# Altium PCB VA_HUB_PCB.PcbDoc (part 11 of 12)
Units mil, origin at the board's own origin, x right, y up, seen from the top; angles counter-clockwise.
Board outline 4408 x 3619 mil, 8 copper layers (Top Layer, Routing 1, Routing 2, Power Plane, GND Plane, Routing 3, Routing 4, Bottom Layer), stack 85.156 mil thick; 569 components, 440 nets, 2911 pads, 1518 vias.
Unrouted connection lines stored in the file: 46.
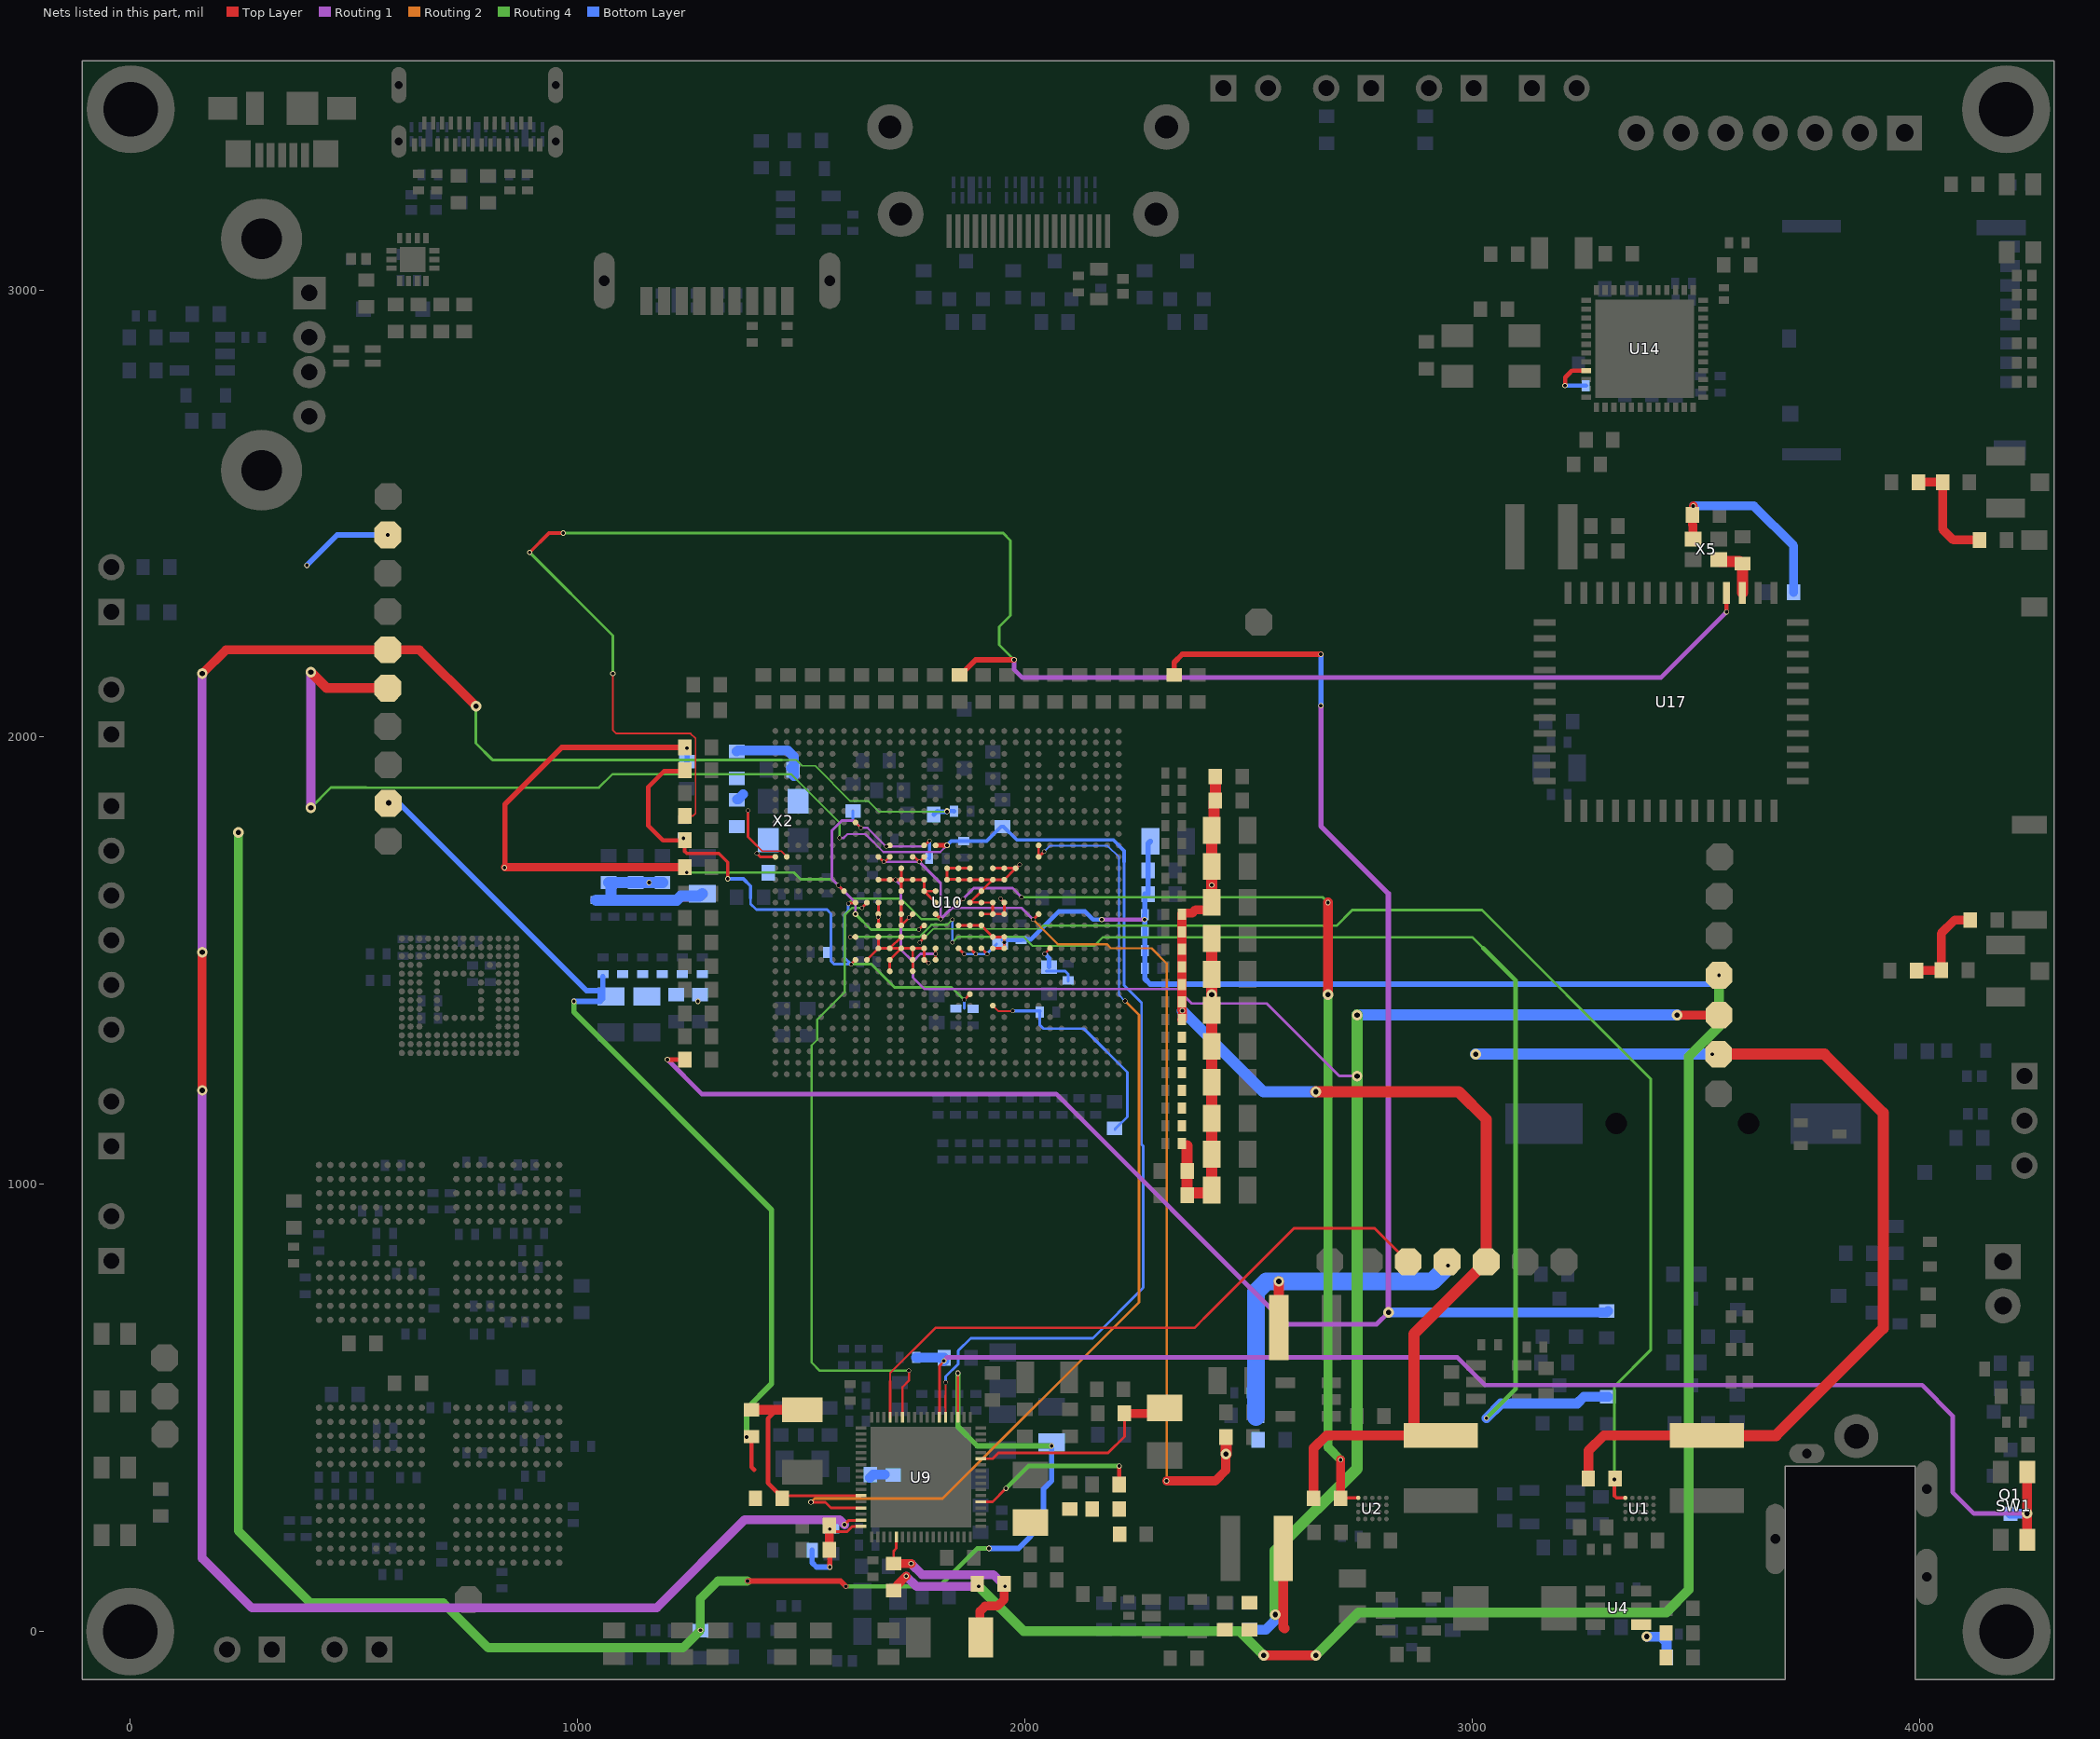
[diagram p14: the nets of this part, all layers, seen from the top]

## Via types
v1: diameter 9.84, hole 7.87, Top Layer to Bottom Layer, 821 vias
v2: diameter 11.81, hole 7.87, Top Layer to Bottom Layer, 575 vias
v3: diameter 23.62, hole 11.81, Top Layer to Bottom Layer, 122 vias

## Nets (pads, with @x,y where several pads share a name; then routed paths per layer and width w, separated by ;. In a path a pad name is that pad's centre, name@x,y a point inside that pad or via, vN(x,y) a via of type N, cw(c..) or ccw(c..) an arc to the next point about the centre after c; other vN are vias at no path point) (continued)
VCC_SDIO: U9.12 U10.T23 | length 1428.1
  Top Layer w5: U9.12@1726.53,479.05 1726.53,546.53 1741,561 1741,583 v1(1740.65,583.35)
  Top Layer w6: v1(1636,1618) 1636,1618.43 1647.05,1629.48 U10.T23@1647.05,1629.92
  Routing 4 w5: v1(1636,1618) 1613.57,1618 1597,1601.43 1597,1429.5 1535.82,1368.32 1535.82,1323 1523.5,1310.68 1523.5,601.5 1542,583 1740.29,583 v1(1740.65,583.35)
VCC_VDC: R28.2 R29.2 | length 36.2
  Bottom Layer w22: R29.2@1653.74,343.82 1661.24,351.32 1686.82,351.32
VCCA0V9_HDMI: C142.1 C143.1 P8.1 U9.5 U10.AA16 U10.AA17 | length 4137.8
  Top Layer w5: U9.5@1822.99,479.05 1822.99,500.24 1822.2,501.03 1822.2,527.5 1822.99,528.29 v1(1823,557)
  Top Layer w10: U10.AA17@1800.59,1757.87 U10.AA16@1826.18,1757.87
  Top Layer w22: v3(403.81,2145) 439.39,2109.42 P8.1@575.82,2109.42
  Routing 1 w5: v1(1586,1774.58) 1595.01,1774.58 1603.52,1783.09 1643.91,1783.09 1683.94,1743.06 1811.06,1743.06 v1(1826,1758)
  Routing 1 w20: v3(403.81,1842) v3(403.81,2145)
  Routing 4 w5: 528,1887 1048,1887 1078,1917 1477.68,1917 1586,1808.68 v1(1586,1774.58)
  Routing 4 w6: v3(403.81,1842) 448.81,1887 528,1887
  Bottom Layer w6: v1(1823,557) 1823,570 1851,598 1851,628 1879,656 2152,656 2264.92,768.92 2264.92,1085.5 2261.17,1089.25 2261.17,1405.83 2222,1445 2222,1721
  Bottom Layer w8: v1(1826,1758) 1835.32,1767.32 1914.82,1767.32 1947.32,1799.82 1952.32,1799.82 1982.14,1770 2197.91,1770 2222,1745.91 2222,1721
VCCA1V8_CODEC: U9.31 U10.AA8 U10.Y8 | length 2275.9
  Top Layer w6: v2(1522,289.17) 1554.1,289.17 1566.98,276.29 U9.31@1634.01,276.29 ; U10.Y8@2030.91,1732.09 U10.Y8@2030.91,1732.28 U10.AA8@2030.91,1757.87 ; U10.Y8@2031.1,1732.09 v1(2043.19,1744.18)
  Routing 2 w6: v2(1522,289.17) 1522.59,289.17 1530.42,297 1816.15,297 2255.27,736.12 2255.27,1378.73 v1(2224,1410)
  Bottom Layer w4: v1(2043.19,1744.18) 2056,1757 2185.32,1757 2211,1731.32 2211,1423 v1(2224,1410)
VCCA1V8_HDMI: C144.1 C145.1 P9.1 U9.33 U10.AD16 | length 5520.3
  Top Layer w6: v2(1597,239) 1606.73,248.73 U9.33@1634.01,248.73
  Top Layer w20: v3(161,1210.19) v3(161,1519) ; v3(161,2142) 214.02,2195.02 P9.1@575.82,2195.02 646.98,2195.02 v3@772.31,2069.69
  Routing 1 w20: v3(161,1210.19) 161,164 272,53 1177,53 1374,250 1586,250 v2(1597,239) ; v3@161,1519.98 v3(161,2142)
  Routing 4 w4: 1456.82,1949.09 1488.99,1949.09 1502.39,1935.69 1531.31,1935.69 1610,1857 1650.28,1857 1673.78,1833.5 1825.59,1833.5 v1(1826.18,1832.9)
  Routing 4 w6: v3(773,2069) 773,1986 809.91,1949.09 1456.82,1949.09
  Bottom Layer w10: C144.1@1796.82,1826.82 1804.64,1834.64 1806.38,1832.9 v1(1826.18,1832.9) ; v1@1826.18,1834.64 1841,1834.64 C145.1@1841.82,1833.82
VCCA3V0_CODEC: P6.1 U9.14 | length 1422.3
  Top Layer w5: 1698.97,559.82 1698.97,577.97 1800,679 2379,679 2400,700
  Top Layer w6: U9.14@1698.97,479.05 1698.97,559.82 ; 2400,700 2602,902 2781.84,902 P6.1@2857.02,826.82
VCCA_0V9: C5.1 C6.1 C9.1 C130.1 C147.1 C154.1 C248.1 L5.1 P5.1 R17.2 R73.1 SB19.2 U10.H14 U10.L24 U10.R8 U10.R17 U10.T24 U10.Y18 U10.Y19 U10.Y21 U10.Y22 | length 4731.3
  Top Layer w6: v1(1605.55,1627.55) 1606.59,1627.55 1607.62,1628.58 1620.12,1628.58 U10.T24@1621.46,1629.92 ; v1@1611.75,1492.25 U10.L24@1621.46,1501.96 ; U10.Y22@1672.64,1732.28 1673.18,1732.28 1684.46,1721 v1(1685,1721) 1685.74,1721.74 1687.69,1721.74 U10.Y21@1698.23,1732.28 ; U10.Y19@1749.41,1732.28 1750.75,1730.94 1754.06,1730.94 v1(1764,1721) 1764,1721.14 1772.79,1729.93 1772.79,1730.85 1772.34,1731.3 U10.Y18@1774.17,1731.3 ; U10.R17@1800.59,1604.33 v1@1811.96,1593 ; v1(1864.45,1412.4) 1864.51,1412.4 U10.H14@1877.37,1425.19 U10.H14@1877.37,1425.19 ; v1@2018.58,1592 U10.R8@2030.91,1604.33
  Top Layer w8: R73.1@1239.82,1769.82 1239.82,1744.51 1244.51,1739.82 1316.18,1739.82 1336,1720 v2(1336,1683)
  Top Layer w10: v2(1236.82,1773.59) R73.1@1237.69,1774.46 ; SB19.2@1239.82,1923.82 1193.82,1923.82 1158,1888 1158,1802 1191,1769 1229.82,1769 1236.48,1775.66 1241,1771.14 R73.1@1241,1766.14
  Top Layer w20: v2(2317,337) 2425.82,337 2449.13,360.31 2449.13,396.13 v3(2449.82,396.82)
  Top Layer w22: L5.1@2567.77,683.82 2567.88,683.94 2567.88,782.88 v3(2568,783)
  Top Layer w25: v3(2449.82,396.82) R17.2@2449.82,434.82
  Routing 1 w6: v1(1685,1721) v1(1764,1721) 1812,1673 v1(1812,1593) 1837,1618 1992.5,1618 v1(2018.58,1591.92)
  Routing 4 w5: v1(1605.55,1627.55) 1616.5,1638.5 1723.5,1638.5 1769,1593 v1(1812,1593)
  Routing 4 w6: v1(1612,1492) 1657,1492 1709,1440 1836.84,1440 v1(1864.45,1412.4)
  Routing 2 w5: v1(2018.58,1591.92) 2073.5,1537 2183.13,1537 2192.3,1527.83 2283.17,1527.83 2317,1494 v2(2317,337)
  Bottom Layer w6: 1387,1640 1387,1627 1400,1614 1558,1614 1567,1605 1567,1499 1574,1492 v1(1612,1492) 1597,1507 1597,1603 1605.55,1611.55 v1(1605.55,1627.55) ; 1864.45,1393.2 v1(1864.45,1412.4)
  Bottom Layer w8: v2(1336,1683) 1371,1683 1387,1667 1387,1640
  Bottom Layer w40: C5.1@2516.82,479.82 2516.82,759.57 2540.25,783 2911,783 v2(2946,818)
VCCA_1V8: C62.1 C152.1 P11.1 R21.2 R58.2 R66.2 R74.1 SB20.2 U9.3 U10.AA18 U10.AA21 U10.AC24 U10.P18 U10.R24 U10.U25 | length 6636.1
  Top Layer w5: U10.AC24@1621.46,1809.05 U10.AC24@1621.46,1809.05 v1(1633.18,1797.19) v1(1633.18,1797.19) ; v1(1690.43,1755.49) 1691.35,1756.41 1696.77,1756.41 U10.AA21@1698.23,1757.87
  Top Layer w6: v1(1583.07,1668.3) U10.U25@1595.87,1655.51 ; v1(1763.1,1569.67) 1768.67,1575.24 1769.62,1575.24 1773.11,1578.74 U10.P18@1775,1578.74 ; U10.AA18@1775,1757.87 1776.87,1757.87 v1(1787,1768) ; v2(1850.42,577.45) 1850.48,577.39 1850.48,479.11 U9.3@1850.55,479.05
  Top Layer w12: v2@838.02,1709.02 838.02,1850.02 965,1977 1237.64,1977 1239.82,1974.82 1240.19,1975.19 v2(1245,1975.19) ; v1(1380,113) 1588,113 v1(1600,101)
  Top Layer w18: v2@838.02,1709.02 R74.1@1239.82,1709.02
  Routing 1 w5: v1(1633.18,1797.19) 1633.38,1797 1648.11,1797 1689.62,1755.49 v1(1690.43,1755.49) 1690.49,1755.42 1774.42,1755.42 v1(1787,1768)
  Routing 1 w6: v1(1621.33,1604.33) 1621.33,1630.05 1569,1682.38 1569,1791 1591,1813 1617.52,1813 1633.18,1797.33 v1(1633.18,1797.19)
  Routing 4 w6: v2(1244,1697) 1484,1697 1499,1682 1569.38,1682 v1(1583.07,1668.3) ; v1(1621.33,1604.33) 1655.98,1569.67 v1(1763.1,1569.67)
  Routing 4 w10: v1(1600,101) 1809,101 1893.65,185.65 1919.65,185.65 v2(1920,186)
  Routing 4 w12: v2@1850.55,577.45 1850.55,458.45 1894.08,414.92 v2(2059.82,414.92)
  Routing 4 w20: v3(242.19,1787) 242.19,224.81 403,64 700,64 800,-36 1236,-36 v2(1274.82,2.82) 1274.82,73.82 1314,113 v1(1380,113)
  Bottom Layer w6: R58.2@1616,1835 1616,1814.52 1633.18,1797.33 v1(1633.18,1797.19)
  Bottom Layer w8: C152.1@1786.32,1728.82 1787,1729.5 v1(1787,1768)
  Bottom Layer w12: v2(395,2384) 462.82,2451.82 v2(575.82,2451.82) ; R66.2@1244.82,1944.82 1245,1945 v2(1245,1975.19) ; v2(1920,186) 1986,186 2041.87,241.87 2041.87,318.87 2059.82,336.82 v2(2059.82,414.92)
  other v2: 837,1708
VDC_RK8: C59.1 C61.2 D7.2 R47.2 U9.34 | length 236.6
  Top Layer w6: v2(1564,229) 1570,223 1602,223 1613.95,234.95 U9.34@1634.01,234.95
  Top Layer w12: R47.2@1563.82,182.82 1564,182.64 1564,177.76 v2(1564,144)
  Top Layer w20: C59.1@1562.82,223 1562.82,183.82 R47.2@1563.82,182.82 ; C59.1@1562.82,236.82 1564,235.64 v2(1564,229)
  Bottom Layer w12: D7.2@1524.62,181.82 1524.62,153.95 1534.56,144 v2(1564,144)
VDD_CENTER: C73.1 C74.1 C76.1 C78.1 C79.1 C80.1 C81.1 C83.1 C85.1 P17.1 R30.1 SB1.1 U10.M11 U10.M12 U10.M13 U10.M14 U10.M15 U10.N11 U10.N12 U10.P13 U10.P14 U10.P15 | length 5582.6
  Top Layer w6: U10.M15@1851.77,1527.55 v1(1864.57,1514.76) ; U10.P15@1851.77,1578.74 U10.P14@1877.37,1578.74 U10.P13@1902.96,1578.74 1915.75,1565.94 1927.84,1553.85 1927.84,1553.14 U10.N12@1928.55,1553.14 U10.N11@1954.14,1553.14 1954.07,1553.08 v1(1954,1541) v1(1954,1541) 1954.07,1540.93 1954.07,1527.62 U10.M11@1954.14,1527.55 U10.M12@1928.55,1527.55 ; U10.M14@1877.37,1527.55 v1(1890.16,1514.76) ; U10.M13@1902.96,1527.55 v1(1915.75,1514.76)
  Top Layer w20: R30.1@1706.87,91.83 1709.37,91.83 1714.37,96.83 1714.37,103.37 v2(1734.84,123.84)
  Top Layer w22: v3(2534,-53) v3(2650.81,-53)
  Routing 1 w10: v2@2172.49,1592 v2(2268,1592)
  Routing 1 w20: v2(1734.84,123.84) 1757.68,101 v2(1897,101)
  Routing 4 w22: v2(1897,101) 1997.18,0.82 2480.18,0.82 v3@2531,-50 ; v3(2650.81,-53) 2746.81,43 3434,43 3484.56,93.56 3484.56,1285.56 3551.73,1352.73 v2@3551.73,1467
  Bottom Layer w6: v1(1864.57,1514.76) 1889,1514.76 v1@1890.16,1515.92 ; v1(1890.16,1514.76) 1914.76,1514.76 C73.1@1937,1537
  Bottom Layer w10: C73.1@1951.32,1546.32 C78.1@1991.82,1546.32 1993.01,1547.51 2013.34,1547.51 2075.83,1610 2135,1610 2153,1592 v2(2172,1592)
  Bottom Layer w12: C81.1@2268,1594 2268,1602.5 C81.1@2268.32,1602.82 C76.1@2268.32,1648.82 ; C81.1@2268.32,1594 C83.1@2268.32,1562.82 C79.1@2268.32,1522.82 C80.1@2268.32,1482.82 2268.32,1459.68 2280.36,1447.64 3532.36,1447.64 v2@3551.73,1467 ; C76.1@2275.82,1648.82 C85.1@2275.82,1701.82 2275.82,1761.82 C74.1@2280.82,1766.82
  other v2: 3551.82,1467.09
VDD_CPU_B: C97.1 C99.1 C101.1 C103.1 C105.1 C107.1 C109.1 C111.1 C112.1 C113.1 C114.1 C115.1 C116.1 C117.1 C119.1 C121.1 C123.1 L1.1 P2.1 R10.2 U10.K19 U10.K21 U10.L18 U10.L19 U10.L21 U10.L23 U10.M18 U10.M19 U10.M20 U10.M21 U10.M22 U10.N20 U10.N22 | length 3350.8
  Top Layer w6: U10.L23@1647.05,1501.96 U10.M22@1672.64,1527.55 ; U10.N22@1672.64,1553.14 U10.M22@1672.64,1527.55 ; U10.K21@1698.23,1476.37 U10.L21@1698.23,1501.96 U10.M20@1723.82,1527.55 ; U10.N20@1723.82,1553.14 U10.M21@1698.23,1527.55 ; U10.K19@1748.93,1476.37 U10.K19@1749.41,1476.37 ; U10.K19@1749,1477 1749.41,1477.41 U10.L19@1749.41,1501.96 U10.M19@1749.41,1527.55 ; v1(1784.84,1494.76) 1783.8,1494.76 1776.6,1501.96 U10.L18@1775,1501.96 U10.M18@1775,1527.55 U10.M19@1749.41,1527.55 ; U10.M22@1672.64,1527.55 U10.M21@1698.23,1527.55 ; U10.M21@1698.23,1527.55 U10.M20@1723.82,1527.55 ; U10.M20@1723.82,1527.55 U10.M19@1749.41,1527.55
  Top Layer w22: R10.2@3259.82,341.82 3259.82,403.82 3294.49,438.49 L1.1@3524.82,438.49
  Top Layer w25: C97.1@2362.82,975.82 C97.1@2362.82,978.32 ; 2362.82,1086.32 C115.1@2362.82,1029.82 C97.1@2362.82,978.32 ; C103.1@2417.82,1469.46 C119.1@2417.82,1549.9 ; v3@2418,1423.45 2418,1389.2 C101.1@2417.82,1389.02 C99.1@2417.82,1308.58 C116.1@2417.82,1228.14 C117.1@2417.82,1147.7 C123.1@2417.82,1067.26 C121.1@2417.82,986.82 2411.82,980.82 2365.32,980.82 C97.1@2362.82,978.32 ; v3(2418,1424.14) C103.1@2418,1469.28 ; L1.1@3524.82,438.49 3679.49,438.49 3919,678 3919,1159.64 3787.73,1290.91 P2.1@3550.82,1290.91
  Bottom Layer w25: v3@3008,1290.91 v2(3536.82,1290.91)
  other v3: 3008,1291
VDD_CPU_B_FB: R10.1 U1.A4 U10.N18 | length 2832.3
  Top Layer w6: v1(1765.01,1540.58) 1765.01,1541.62 1775,1551.61 U10.N18@1775,1553.14 ; v2(3317.82,339.82) R10.1@3319.82,341.82
  Top Layer w8: v2(3317.82,339.82) 3317.82,303.82 3322.82,298.82 U1.A4@3342.58,298.82
  Routing 4 w4: v1(1765.01,1540.58) 1795.51,1571.08 2034.08,1571.08 2037.54,1574.54
  Routing 4 w5: 2037.54,1574.54 2041,1578 2697,1578 2714.5,1595.5
  Routing 4 w6: 2714.5,1595.5 2732,1613 3022,1613 3399,1236 3399,629 3317.82,547.82 v2(3317.82,339.82)
VDD_CPU_L: C63.1 C64.1 C65.1 C66.1 C67.1 C68.1 C69.1 C70.1 C71.1 C72.1 P18.1 R31.1 SB2.1 U10.P20 U10.P22 U10.R19 U10.R20 U10.R22 U10.T20 U10.T22 | length 2184.2
  Top Layer w6: U10.P22@1672.64,1578.74 v1(1672.64,1597) U10.R22@1672.64,1604.33 U10.T22@1672.64,1629.92 ; U10.T20@1723.82,1629.92 U10.R20@1723.82,1604.33 U10.P20@1723.82,1578.74 1723.89,1578.74 v1@1741,1595.85 ; v1@1741.04,1596 U10.R19@1749.37,1604.33
  Top Layer w10: v2(1378.09,435) SB2.1@1388.87,435 ; SB2.1@1388.87,435.83 1388.87,367.78 1394.82,361.82
  Routing 4 w6: v1(1672.64,1597) v1@1672.93,1596.71 ; v1@1740.71,1596.71 v1(1741,1596.42)
  Routing 4 w12: v2(992.05,1409) 992.05,1384.95 1434,943 1434,554 1378.09,498.09 v2(1378.09,435)
  Bottom Layer w12: v3(577.81,1852.82) 578.21,1852.43 600.57,1852.43 1020.03,1432.97 1050.82,1432.97 C66.1@1050.82,1419 ; v2(992.05,1409) 1050.82,1409 1056.82,1415 C70.1@1056.82,1464.32
  other v2: 1269,1409
VDD_DDR0_CLK: C259.1 R45.2 U10.M7 | length 118.6
  Top Layer w5: v1@2045.05,1515.76 U10.M7@2056.5,1527.21
  Bottom Layer w5: R45.2@2054,1486 R45.2@2054.89,1486.89
  Bottom Layer w6: R45.2@2048.11,1476.37 2090.63,1476.37 2097,1470 C259.1@2097,1453.5
  Bottom Layer w10: v1(2045.05,1515.41) 2054,1506.46 R45.2@2054,1486
VDD_DDR1_CLK: C141.1 R49.2 U10.G12 | length 518.7
  Top Layer w4: U10.G12@1928.55,1398.6 1929.55,1398.6 1941.33,1386.82 1972.07,1386.82 v1(1972.82,1387.58)
  Bottom Layer w6: C141.1@2033.5,1385 2033.5,1356.5 2042,1348 2132,1348 2229.17,1250.83 2229.17,1150.67 2201.82,1123.32 R49.2@2201.82,1121.89
  Bottom Layer w8: v1(1972.82,1387.58) 2032.74,1387.58 C141.1@2033.5,1386.82
VDD_GPU: C92.1 C93.1 C94.1 C95.1 C96.1 C98.1 C100.1 C102.1 C104.1 C106.1 C108.1 C110.1 L2.1 P3.1 R11.2 U10.R11 U10.R12 U10.R13 U10.T11 U10.T12 U10.T13 U10.T14 U10.U13 U10.V11 U10.V12 U10.V13 U10.V14 U10.V15 U10.V16 U10.W10 U10.W11 U10.W12 U10.W14 U10.W15 U10.W16 | length 3045.5
  Top Layer w5: U10.T14@1877.37,1629.92 1877.74,1630.29 1902.58,1630.29 U10.T13@1902.96,1629.92 U10.T12@1928.55,1629.92
  Top Layer w6: U10.T14@1877.37,1629.92 U10.U13@1902.96,1655.51 U10.U13@1902.96,1655.51 1915.75,1668.37 1915.82,1668.37 U10.V12@1928.55,1681.1 ; U10.W14@1877.37,1706.69 U10.W15@1851.77,1706.69 1851.62,1706.84 1839.16,1706.84 1839,1707 1838.84,1706.84 1826.34,1706.84 U10.W16@1826.18,1706.69 1826.18,1682.74 1827.01,1681.92 1850.95,1681.92 U10.V15@1851.77,1681.1 U10.V14@1877.37,1681.1 U10.V13@1902.96,1681.1 U10.V12@1928.55,1681.1 ; U10.R13@1902.96,1604.33 U10.R12@1928.55,1604.33 ; U10.T12@1928.55,1629.73 U10.R12@1928.55,1604.33 ; U10.W12@1928.55,1706.69 U10.W10@1979.73,1706.69 ; v1(1946,1639) 1946,1638.53 1954.14,1630.39 U10.T11@1954.14,1629.92 ; U10.T11@1954.14,1631.86 U10.R11@1954.14,1604.33 U10.R12@1928.55,1604.33 ; U10.W10@1979.73,1708.17 U10.W10@1979.73,1706.69 ; U10.W10@1980.2,1706.69 v1@1988.34,1714.83 ; U10.V12@1928.55,1681.1 U10.V11@1954.14,1681.1 U10.W10@1979.73,1706.69
  Top Layer w20: C102.1@2351.32,1368.32 2352.32,1369.32 2352.32,1380.05 2352.41,1380.13 v2(2352.41,1388.3) ; v2@2351.32,1388.3 C98.1@2351.32,1446.95 C96.1@2351.32,1486.26 C108.1@2351.32,1525.82 2351.32,1605.24 2352.32,1606.24 2374.24,1606.24 2381.87,1613.87 2407.82,1613.87 2417.82,1623.87 C95.1@2417.82,1630.34
  Top Layer w22: R11.2@2645.82,297.82 2645.82,409.82 2674.49,438.49 L2.1@2865,438.49
  Top Layer w25: C95.1@2417.82,1630.34 v2(2417.82,1669.09) C94.1@2417.82,1710.78 C93.1@2417.82,1791.22 2423.32,1796.72 2423.32,1855.32 C110.1@2425.82,1857.82 C92.1@2425.82,1911.82 ; v3(2650.72,1207) 2970,1207 3031.42,1145.58 P3.1@3031.42,826.82 ; L2.1@2865,438.49 2870,443.49 2870,665.4 P3.1@3030.52,825.92
  Bottom Layer w25: v2(2352.41,1388.3) 2352.41,1387.66 2533.06,1207 v3(2650.72,1207)
  other v1: 1988.81,1714.83
VDD_GPU_FB: R11.1 U2.A4 U10.T15 | length 2236.9
  Top Layer w6: U10.T15@1851.77,1629.92 1852.88,1629.92 1860.96,1638 v1(1862,1638)
  Top Layer w8: R11.1@2706.82,298.82 U2.A4@2745.58,298.82
  Top Layer w12: R11.1@2705.82,297.82 R11.1@2706.82,298.82
  Top Layer w20: R11.1@2705.82,297.82 2705.82,383.82 v2(2706,384)
  Top Layer w22: v3(2678,1424.14) v2(2678,1630)
  Routing 1 w6: v1(1862,1638) 1886,1662 1972.92,1662 1992.94,1641.98 v1(1992.94,1641.9)
  Routing 4 w6: v1(1992.94,1641.9) 2666.08,1641.92 v2(2678,1630)
  Routing 4 w20: v3(2678,1424.14) 2678,412 v2(2706,384)
VDD_LOG: C1.1 C118.1 C120.1 C122.1 C124.1 C125.1 C126.1 C127.1 C128.1 C129.1 L4.1 P4.1 R2.1 R2.2 R3.2 U10.L17 U10.M17 U10.T17 U10.U17 U10.U18 U10.U20 U10.V18 U10.V19 U10.V20 U10.V21 U10.V22 U10.W20 | length 4540
  Top Layer w6: U10.V22@1672.64,1681.1 U10.V21@1698.23,1681.1 1698.28,1681.05 1710.95,1681.05 v1(1711,1681) v1(1711,1681) 1723.77,1681.05 U10.V20@1723.82,1681.1 ; U10.W20@1720.86,1703.73 U10.W20@1723.82,1706.69 U10.V20@1723.82,1681.1 ; U10.U20@1723.82,1655.51 U10.V20@1723.82,1681.1 ; v1@1800.3,1513.3 1800.3,1527.26 U10.M17@1800.59,1527.55 ; v1(1800.37,1515.37) 1800.48,1515.26 1800.48,1502.08 U10.L17@1800.59,1501.96 ; U10.T17@1800.59,1629.92 1776.22,1654.3 U10.U18@1776.22,1655.51 ; U10.U17@1800.59,1655.51 U10.U18@1776.22,1655.51 ; U10.V20@1723.82,1681.1 U10.V19@1749.41,1681.1 U10.V18@1775,1681.1 U10.U18@1775,1655.51 U10.U18@1776.22,1655.51
  Top Layer w20: v3(3458.37,1378.37) P4.1@3551.82,1378.37
  Top Layer w22: L4.1@2577.88,185.82 2577.88,9.77 2580.82,6.82
  Routing 1 w5: 1762.5,1449.5 1775,1437 2340.5,1437 2356.84,1420.66
  Routing 1 w6: v1(1711,1681) 1723,1669 1723,1525 1750,1498 ; 1762.5,1449.5 1750,1462 1750,1498 ; v1(1800.37,1515.37) 1800,1515 1767,1515 1750,1498 ; 2356.84,1420.66 2373.17,1404.33 2540.67,1404.33 2703,1242 v3(2743,1242)
  Routing 4 w25: v3(2559.82,37.82) 2559.82,180.82 2743,364 v3(2743,1378.37)
  Bottom Layer w22: C1.1@2502.82,3.82 2538.82,3.82 2559.51,24.51 2559.51,37.51 v3(2559.82,37.82)
  Bottom Layer w25: C124.1@1041.82,1635.32 C126.1@1080.8,1635.32 ; C129.1@1069.82,1674.82 C129.1@1072.32,1674.82 ; C118.1@1190.2,1674.82 v2(1160.1,1674.82) C122.1@1130.01,1674.82 C129.1@1072.32,1674.82 ; C120.1@1278.82,1649.82 1273.31,1644.31 1231.31,1644.31 1222.32,1635.32 C125.1@1197.72,1635.32 C127.1@1158.75,1635.32 C128.1@1119.77,1635.32 C126.1@1080.8,1635.32 ; v3(2743,1378.37) v3(3458.37,1378.37) ; C129.1@1072.32,1674.82 1074.82,1672.32 1074.82,1641.3 C126.1@1080.8,1635.32
VFB1: L6.1 R30.2 SB1.2 U9.39 | length 516.8
  Top Layer w6: R30.2@1706.87,151.83 1706.87,179.83 1712.75,185.71 U9.39@1712.75,211.33
  Top Layer w20: R30.2@1706.87,151.83 v2(1745.83,151.83) ; L6.1@1901.7,-16.18 1899.82,-14.3 1899.82,45.11 1911.54,56.82 1938.82,56.82 1953.82,71.82 SB1.2@1953.82,106
  Top Layer w22: L6.1@1901.7,-16.18 L6.1@1918.26,0.38
  Routing 1 w20: v2(1745.83,151.83) 1770.66,127 1930,127 v2(1956,101)
VFB2: L7.1 R31.2 SB2.2 U9.29 | length 533.5
  Top Layer w6: R31.2@1457.82,297.82 1463.85,303.85 U9.29@1634.01,303.85
  Top Layer w8: SB2.2@1386.37,495.83 SB2.2@1388.87,495.83
  Top Layer w10: 1445.24,495.59 1425.82,476.17 1425.82,332.32 1457.82,300.32 R31.2@1457.82,297.82
  Top Layer w22: SB2.2@1387.62,495.59 1445.24,495.59 L7.1@1520.87,495.59
VFB3: C43.2 R33.1 R34.2 U9.56 | length 383.7
  Top Layer w6: U9.56@1901.73,290.07 1928.04,290.04 v2(1958,320)
  Top Layer w10: R33.1@2210.82,328.82 2211,329 v2(2211,370)
  Routing 4 w10: v2(1958,320) 2008,370 v2(2211,370)
VFB3#: C43.1 L8.1 SB3.2
VFB4: L9.1 SB4.2 U9.63 | length 488.5
  Top Layer w6: U9.63@1901.73,386.53 1928.18,386.53 1941.47,399.82 2186.82,399.82 2222.82,435.82 SB4.2@2222.82,487.82 ; L9.1@2300.67,487.82 L9.1@2312.82,499.97
  Top Layer w20: SB4.2@2222.82,487.82 L9.1@2300.67,487.82
VFB_TPS563201: C7.2 R14.1 R15.1 U4.4 | length 83.4
  Bottom Layer w22: v3(3390.82,-11.18) 3421.82,-11.18 3434.82,-24.18 C7.2@3434.82,-58.18
VPP_OTP: C46.1 Q1.3 R38.2 SW1.2 U9.6 | length 3058.9
  Top Layer w6: U9.6@1809.21,479.05 1809.21,593.71 1819,603.51 v2(1819,605)
  Top Layer w22: SW1.2@4241.09,205.03 4241.09,356.35 SW1.2@4241.35,356.61
  Routing 1 w10: v2(1819,605) 1827.09,613.09 2966.91,613.09 3029.18,550.82 4005.82,550.82 4074.32,482.32 4074.32,311.68 4122.18,263.82 v3(4240.82,263.82)
  Bottom Layer w22: C46.1@1757.32,612.32 1819.32,612.32 R38.2@1819.82,611.82 1819.82,605.82 v2(1819,605) ; Q1.3@4203.42,263.5 4240.5,263.5 v3(4240.82,263.82)
VREF+: C181.2 U14.9 | length 126.5
  Top Layer w10: v2(3207.82,2785.82) 3208.17,2786.17 3208.17,2804.17 3211.82,2807.82 ; 3217.82,2813.82 3211.82,2807.82 ; U14.9@3255.01,2819.14 3223.14,2819.14 3211.82,2807.82
  Bottom Layer w10: v2(3207.82,2785.82) C181.2@3254.32,2785.82
WIFI_REG_ON_H: SB16.2 SB23.2 U17.15 | length 4114.3
  Top Layer w4: v2(1079,2142) 1079,2016 1087,2008 1253,2008 1264,1997 1264,1829 1258.82,1823.82 SB16.2@1239.82,1823.82
  Top Layer w8: v2(893,2413) 936,2456 v2(968,2456)
  Top Layer w10: v2@3568.84,2279.82 U17.15@3568.84,2322.52
  Top Layer w12: SB23.2@1859.79,2142.82 1889.97,2173 v2(1976,2173)
  Top Layer w22: SB23.2@1853.29,2138.82 1855.79,2138.82 SB23.2@1859.79,2142.82
  Routing 1 w10: v2(1976,2173) 1976,2151 1994,2133 3422.17,2133 v2(3568.99,2279.82)
  Routing 4 w6: v2(893,2413) 1079,2227 v2(1079,2142) ; v2(968,2456) 1951.64,2456 1968,2439.64 1968,2272 1943,2247 1943,2206 v2(1976,2173)
WL_ANT0: C239.1 SB29.1 SB30.2 | length 214.8
  Top Layer w20: C239.1@3993.82,1477.82 3994.32,1478.32 4048.32,1478.32 SB29.1@4048.82,1478.82 4048.82,1560.82 4078.82,1590.82 SB30.2@4113.82,1590.82
WL_ANT1: C240.1 SB31.2 SB32.1 | length 251.9
  Top Layer w20: C240.1@3997.82,2569.82 SB32.1@4051.82,2569.82 4051.82,2464.82 4075.82,2440.82 SB31.2@4134.82,2440.82
WLRF_XIN: C243.2 R112.2 X5.1 | length 440.7
  Top Layer w20: X5.1@3494.28,2442.46 3493.55,2443.19 3493.55,2473.82 3492.82,2474.55 C243.2@3492.82,2496.82 3494.46,2498.46 v2(3494.46,2516.69)
  Bottom Layer w20: v2(3494.46,2516.69) 3629.95,2516.69 3718.82,2427.82 R112.2@3718.82,2323.82
WLRF_XOUT: C244.2 U17.14 X5.3 | length 122.6
  Top Layer w25: X5.3@3551.37,2397.18 3555.6,2392.95 3597.19,2392.95 3602.32,2387.82 C244.2@3604.82,2387.82 U17.14@3604.82,2322.52
WORK_LED: R123.2 SB5.1 SB21.2 | length 4297
  Top Layer w10: v2@1201,1278.82 SB5.1@1239.82,1278.82
  Top Layer w12: SB21.2@2334.04,2138.82 2334.04,2167.04 2352,2185 v2(2662,2185)
  Routing 1 w10: v2(1201,1279) 1278,1202 2070,1202 2585,687 2786.6,687 v3(2813,713.4)
  Routing 1 w12: v2(2662,2070) 2662,1801 2813,1650 v3(2813,713.4)
  Bottom Layer w12: v2(2662,2070) v2(2662,2185)
  Bottom Layer w22: v3(2813,713.4) 3300.4,713.4 R123.2@3303.82,716.82
XIN: C148.2 R64.2 U10.Y31 X2.1 | length 44.5
  Top Layer w6: v1(1401,1740) 1408.72,1732.28 U10.Y31@1442.33,1732.28
XOUT: C149.2 R63.1 X2.3 | length 183.4
  Bottom Layer w22: R63.1@1356.14,1967.82 1358.54,1970.22 1469.78,1970.22 1484,1956 1484,1926.82 C149.2@1484,1913 ; C149.2@1478.14,1930.82 C149.2@1482.14,1926.82
XOUT#: R63.2 R64.1 U10.Y30 | length 182.4
  Top Layer w4: 1400,1758 1413,1745 1455.19,1745 U10.Y30@1467.92,1732.28
  Top Layer w6: v1(1381,1835.9) 1381,1777 1400,1758
  Bottom Layer w22: R64.1@1356.82,1860.82 1359.32,1860.82 R64.1@1370.32,1871.82
YELLOW_LED: R125.2 U10.N24 | length 2925
  Top Layer w4: v1(1610,1553) v1(1610,1553) 1621.39,1553.07 U10.N24@1621.46,1553.14
  Routing 4 w5: v1(1610,1553) 1764,1553 1791.58,1580.58 1826.58,1580.58 v1(1838,1592) ; v1(1838,1541) 1850.42,1553.42 1996.86,1553.42 2017.28,1533 2155,1533 2174.67,1552.67 3000.33,1552.67 3025,1528
  Routing 4 w10: 3025,1528 3097,1456 3097,542 v2(3032,477)
  Bottom Layer w5: v1(1838,1541) v1(1838,1592)
  Bottom Layer w22: v2(3032,477) 3064.82,509.82 3234.82,509.82 3249.82,524.82 R125.2@3303.82,524.82
pads on no net: D17.4 D17.5 D17.6 D17.7 J9.1 J9.4 J11.MH1 J11.MH2 U9.47 U9.48 U9.54 U10. U10.A3 U10.A4 U10.A6 U10.A7 U10.A28 U10.A29 U10.A30 U10.AA6 U10.AA7 U10.AA19 U10.AA20 U10.AA22 U10.AA27 U10.AA28 U10.AB12 U10.AB20 U10.AB22 U10.AB30 U10.AB31 U10.AC6 U10.AC7 U10.AC12 U10.AC14 U10.AC19 U10.AC27 U10.AC28 U10.AD6 U10.AD11 U10.AD12 U10.AD14 U10.AD15 U10.AD18 U10.AD20 U10.AD24 U10.AD25 U10.AD27 U10.AD28 U10.AD30 U10.AD31 U10.AE5 U10.AE6 U10.AE18 U10.AE20 U10.AE24 U10.AE26 U10.AE30 U10.AE31 U10.AF3 U10.AF5 U10.AF12 U10.AF21 U10.AF25 U10.AF27 U10.AF28 U10.AF30 U10.AF31 U10.AG9 U10.AG11 U10.AG12 U10.AG14 U10.AG15 U10.AG25 U10.AG26 U10.AG28 U10.AG30 U10.AG31 U10.AH2 U10.AH3 U10.AH5 U10.AH9 U10.AH11 U10.AH12 U10.AH14 U10.AH15 U10.AH18 U10.AH20 U10.AH21 U10.AH30 U10.AH31 U10.AJ1 U10.AJ3 U10.AJ30 U10.AJ31 U10.AK1 U10.AK4 U10.AK6 U10.AK7 U10.AK8 U10.AK9 U10.AK10 U10.AK11 U10.AK12 U10.AK13 U10.AK14 U10.AK15 U10.AK27 U10.AK28 U10.AK29 U10.AK31 U10.AL3 U10.AL6 U10.AL7 U10.AL8 U10.AL9 U10.AL10 U10.AL11 U10.AL12 U10.AL13 U10.AL14 U10.AL15 U10.AL27 U10.AL28 U10.AL29 U10.B2 U10.B4 U10.B6 U10.B7 U10.B27 U10.B28 U10.B29 U10.B30 U10.C1 U10.C3 U10.C4 U10.C5 U10.C6 U10.C27 U10.C30 U10.C31 U10.D1 U10.D2 U10.D3 U10.D6 U10.D11 U10.D12 U10.D26 U10.D27 U10.D30 U10.D31 U10.E3 U10.E25 U10.E26 U10.E28 U10.E29 U10.E30 U10.F3 U10.F4 U10.F7 U10.F9 U10.F14 U10.F17 U10.F23 U10.F24 U10.F25 U10.F27 U10.F28 U10.F29 U10.F30 U10.F31 U10.G6 U10.G8 U10.G14 U10.G17 U10.G20 U10.G21 U10.G23 U10.G24 U10.G26 U10.G31 U10.H6 U10.H7 U10.H20 U10.H21 U10.H22 U10.H23 U10.H24 U10.H25 U10.H27 U10.H29 U10.H30 U10.H31 U10.J1 U10.J2 U10.J19 U10.J20 U10.K1 U10.K2 U10.L26 U10.L30 U10.M4 U10.M27 U10.M31 U10.P30 U10.P31 U10.R27 U10.R28 U10.U6 U10.U7 U10.U30 U10.V6 U10.V7 U10.V26 U11.3 U12.3 U14.2 U14.10 U14.11 U14.12 U14.13 U14.14 U14.15 U14.18 U14.19 U14.26 U14.27 U14.29 U14.30 U14.31 U14.38 U14.39 U14.40 U14.41 U14.42 U14.43 U14.45 U14.46 U15.A1 U15.A2 U15.A11 U15.A12 U15.AA1 U15.AA12 U15.AB1 U15.AB2 U15.AB11 U15.AB12 U15.B1 U15.B12 U15.G11 U15.K5 U15.K8 U15.N5 U15.N8 U16.A1 U16.A2 U16.A7 U16.A8 U16.A9 U16.A10 U16.A11 U16.A12 U16.A13 U16.A14 U16.B1 U16.B7 U16.B8 U16.B9 U16.B10 U16.B11 U16.B12 U16.B13 U16.B14 U16.C1 U16.C3 U16.C5 U16.C7 U16.C8 U16.C9 U16.C10 U16.C11 U16.C12 U16.C13 U16.C14 U16.D1 U16.D2 U16.D3 U16.D4 U16.D12 U16.D13 U16.D14 U16.E1 U16.E2 U16.E3 U16.E5 U16.E8 U16.E9 U16.E10 U16.E12 U16.E13 U16.E14 U16.F1 U16.F2 U16.F3 U16.F10 U16.F12 U16.F13 U16.F14 U16.G1 U16.G2 U16.G3 U16.G10 U16.G12 U16.G13 U16.G14 U16.H1 U16.H2 U16.H3 U16.H12 U16.H13 U16.H14 U16.J1 U16.J2 U16.J3 U16.J12 U16.J13 U16.J14 U16.K1 U16.K2 U16.K3 U16.K6 U16.K7 U16.K10 U16.K12 U16.K13 U16.K14 U16.L1 U16.L2 U16.L3 U16.L12 U16.L13 U16.L14 U16.M1 U16.M2 U16.M3 U16.M7 U16.M8 U16.M9 U16.M10 U16.M11 U16.M12 U16.M13 U16.M14 U16.N1 U16.N3 U16.N6 U16.N7 U16.N8 U16.N9 U16.N10 U16.N11 U16.N12 U16.N13 U16.N14 U16.P1 U16.P2 U16.P7 U16.P8 U16.P9 U16.P10 U16.P11 U16.P12 U16.P13 U16.P14 U17.12 U17.27 U17.28 U17.29 U17.30 U17.33 U17.35 U17.37 U17.44 U17.45 U17.46 U17.48 U18.A1 U18.A2 U18.A11 U18.A12 U18.AA1 U18.AA12 U18.AB1 U18.AB2 U18.AB11 U18.AB12 U18.B1 U18.B12 U18.G11 U18.K5 U18.K8 U18.N5 U18.N8

## Polygon pours and split planes (outlines as drawn)
GND on GND Plane (split plane): 4280.73,-87.08 4010.92,-87.08 4010.92,369.82 4010.53,373.74 4009.39,377.51 4007.53,380.99 4005.03,384.03 4001.99,386.53 3998.51,388.39 3994.74,389.53 3990.82,389.92 3699.57,389.92 3695.65,389.53 3691.88,388.39 3688.41,386.53 3685.36,384.03 3682.86,380.99 3681.01,377.51 3679.86,373.74 3679.48,369.82 3679.48,-87.08 -87.08,-87.08 -87.08,3491.73 4280.73,3491.73
VDD_LOG on Power Plane (split plane): 1785.52,1766.45 1783.85,1765.07 1783.34,1764.66 1781.47,1762.37 1780.07,1759.77 1779.22,1756.94 1778.93,1754 1778.93,1654.07 1700.51,1654.07 1700.51,1787 1700.22,1789.94 1699.36,1792.77 1697.97,1795.37 1696.09,1797.66 1693.81,1799.53 1691.2,1800.93 1688.38,1801.78 1685.44,1802.07 1269.82,1802.07 1266.88,1801.78 1264.05,1800.93 1261.45,1799.53 1259.16,1797.66 1257.29,1795.37 1255.9,1792.77 1255.04,1789.94 1254.75,1787 1254.75,1704.18 1254.75,1654.07 1127.07,1654.07 1127.07,1749 1127.07,1878.93 1785.52,1878.93
VDD_GPU on Power Plane (split plane): 3029.93,1563.07 1809.07,1563.07 1809.07,1734.93 1859,1734.93 1861.94,1735.22 1864.77,1736.07 1867.37,1737.47 1869.15,1738.93 3029.93,1738.93
VDD_CPU_L on Power Plane (split plane): 1670.36,1639 1670.65,1636.06 1671.51,1633.23 1672.9,1630.63 1674.78,1628.34 1677.06,1626.47 1679.67,1625.07 1682.5,1624.22 1685.44,1623.93 1778.93,1623.93 1778.93,1563.07 1770.28,1563.07 1767.94,1563.78 1765,1564.07 1762.06,1563.78 1759.72,1563.07 1723.8,1563.07 1720.86,1562.78 1718.03,1561.93 1715.43,1560.53 1713.14,1558.66 1711.27,1556.37 1709.88,1553.77 1709.02,1550.94 1708.73,1548 1708.73,1408.28 1127.07,1408.28 1127.07,1623.93 1269.82,1623.93 1272.76,1624.22 1275.59,1625.07 1278.2,1626.47 1280.48,1628.34 1282.35,1630.63 1283.75,1633.23 1284.61,1636.06 1284.9,1639 1284.9,1704.18 1284.9,1771.93 1670.36,1771.93
VCC3V3_S3 on Power Plane (split plane): 770.93,1253.07 516.07,1253.07 516.07,1364.77 517.37,1365.47 517.93,1365.93 770.93,1365.93
VCC_5V on Power Plane (split plane): 158 vertices, not listed, extent 1281.07,-87.08 4280.73,3061.93
VCC3V3_SYS on Power Plane (split plane): 1929.93,439.24 1879.34,388.66 1877.47,386.37 1876.07,383.77 1875.22,380.94 1874.93,378 1874.93,57 1875.22,54.06 1876.07,51.23 1877.47,48.63 1879.34,46.34 1881.63,44.47 1884.23,43.07 1887.06,42.22 1890,41.93 2230,41.93 2232.94,42.22 2235.77,43.07 2238.37,44.47 2240.66,46.34 2300.66,106.34 2302.53,108.63 2303.93,111.23 2304.78,114.06 2305.07,117 2305.07,494.76 2398.24,587.93 3258.93,587.93 3258.93,30.89 2962.07,30.89 2962.07,472 2961.78,474.94 2960.93,477.77 2959.53,480.37 2957.66,482.66 2955.37,484.53 2952.77,485.93 2949.94,486.78 2947,487.07 2425,487.07 2422.06,486.78 2419.23,485.93 2416.63,484.53 2414.34,482.66 2364.34,432.66 2362.47,430.37 2361.07,427.77 2360.22,424.94 2359.93,422 2359.93,71.24 2287.76,-0.93 1834.07,-0.93 1834.07,232 1833.78,234.94 1832.93,237.77 1831.53,240.37 1829.66,242.66 1651.66,420.66 1649.37,422.53 1646.77,423.93 1643.94,424.78 1641,425.07 1635.07,425.07 1635.07,616.93 1929.93,616.93
VDD_CPU_B on Power Plane (split plane): 1766,1532.93 3029.93,1532.93 3029.93,740.89 2378.07,740.89 2378.07,1246 2378.07,1393.2 2377.78,1396.14 2376.93,1398.97 2375.53,1401.58 2373.66,1403.86 2371.37,1405.74 2368.77,1407.13 2365.94,1407.99 2363,1408.28 1738.87,1408.28 1738.87,1532.93 1765,1532.93 1765.5,1532.98
VCC_3V3 on Power Plane (split plane): 4280.73,3092.07 2488,3092.07 1501.07,3092.07 1501.07,3177 1500.78,3179.94 1499.93,3182.77 1498.53,3185.37 1496.66,3187.66 1494.37,3189.53 1491.77,3190.93 1488.94,3191.78 1486,3192.07 1358,3192.07 1355.06,3191.78 1352.23,3190.93 1349.63,3189.53 1347.34,3187.66 1345.47,3185.37 1344.07,3182.77 1343.22,3179.94 1342.93,3177 1342.93,3062.07 868.01,3062.07 868.01,3365 867.72,3367.94 866.86,3370.77 865.47,3373.37 863.6,3375.66 861.31,3377.53 858.71,3378.93 855.88,3379.78 852.94,3380.07 156,3380.07 153.06,3379.78 150.23,3378.93 147.63,3377.53 145.34,3375.66 143.47,3373.37 142.07,3370.77 141.22,3367.94 140.93,3365 140.93,2838 140.93,1590 141.22,1587.06 142.07,1584.23 143.47,1581.63 145.34,1579.34 147.63,1577.47 150.23,1576.07 153.06,1575.22 156,1574.93 866.93,1574.93 866.93,1396.07 -87.08,1396.07 -87.08,3491.73 4280.73,3491.73
VCC5V0_HOST1 on Power Plane (split plane): 1470.93,3077 1470.93,3024 1470.93,2895.07 466.07,2895.07 466.07,3031.93 1359,3031.93 1361.94,3032.22 1364.77,3033.07 1367.37,3034.47 1369.66,3036.34 1371.53,3038.63 1372.93,3041.23 1373.78,3044.06 1374.07,3047 1373.78,3049.94 1373.07,3052.28 1373.07,3161.93 1470.93,3161.93
VBUS_TYPEC0 on Power Plane (split plane): 837.86,3062.07 449,3062.07 446.06,3061.78 443.23,3060.93 440.63,3059.53 438.34,3057.66 436.47,3055.37 435.07,3052.77 434.22,3049.94 433.93,3047 433.98,3046.5 433.93,3046 433.93,2853.07 171.07,2853.07 171.07,3349.93 837.86,3349.93
VCCA_1V8 on Power Plane (split plane): 433.93,1974 434.22,1971.06 435.07,1968.23 436.47,1965.63 438.34,1963.34 440.63,1961.47 443.23,1960.07 446.06,1959.22 449,1958.93 742.76,1958.93 866.93,1834.76 866.93,1605.07 171.07,1605.07 171.07,2822.93 433.93,2822.93
VCC_3V0 on Power Plane (split plane): 2472.93,2095 2473.22,2092.06 2474.07,2089.23 2475.47,2086.63 2477.34,2084.34 2478.54,2083.36 2479.52,2082.16 2481.8,2080.29 2484.41,2078.9 2487.24,2078.04 2490.18,2077.75 2838.93,2077.75 2838.93,1769.07 1815.67,1769.07 1815.67,1894 1815.38,1896.94 1814.52,1899.77 1813.13,1902.37 1811.25,1904.66 1808.97,1906.53 1806.36,1907.93 1803.53,1908.78 1800.59,1909.07 1112,1909.07 1109.06,1908.78 1106.23,1907.93 1103.63,1906.53 1101.34,1904.66 1099.47,1902.37 1098.07,1899.77 1097.22,1896.94 1096.93,1894 1096.93,1749 1096.93,1393.2 1097.22,1390.26 1098.07,1387.44 1099.47,1384.83 1101.34,1382.55 1103.63,1380.67 1106.23,1379.28 1109.06,1378.42 1112,1378.13 2347.93,1378.13 2347.93,1246 2347.93,740.89 2094.28,740.89 2091.94,741.61 2089,741.89 1620,741.89 1617.06,741.61 1614.23,740.75 1611.63,739.35 1609.34,737.48 1607.47,735.2 1606.07,732.59 1605.22,729.76 1604.93,726.82 1604.97,726.41 1604.93,726 1604.93,632 1604.93,425.07 1449.07,425.07 1449.07,726 1449.07,1161 1448.78,1163.94 1447.93,1166.77 1446.53,1169.37 1444.66,1171.66 1411.66,1204.66 1409.37,1206.53 1406.77,1207.93 1403.94,1208.78 1401,1209.07 836.24,1209.07 801.07,1244.24 801.07,1365.93 882,1365.93 884.94,1366.22 887.77,1367.07 890.37,1368.47 892.66,1370.34 894.53,1372.63 895.93,1375.23 896.78,1378.06 897.07,1381 897.07,1590 897.07,1841 896.78,1843.94 895.93,1846.77 894.53,1849.37 892.66,1851.66 759.66,1984.66 757.37,1986.53 754.77,1987.93 751.94,1988.78 749,1989.07 464.07,1989.07 464.07,2838 464.07,2864.93 1486,2864.93 1488.94,2865.22 1491.77,2866.07 1494.37,2867.47 1496.66,2869.34 1498.53,2871.63 1499.93,2874.23 1500.78,2877.06 1501.07,2880 1501.07,3061.93 2472.93,3061.93
VCC_DDR on Power Plane (split plane): 485.93,1238 486.22,1235.06 487.07,1232.23 488.47,1229.63 490.34,1227.34 492.63,1225.47 495.23,1224.07 498.06,1223.22 501,1222.93 779.76,1222.93 819.34,1183.34 821.63,1181.47 824.23,1180.07 827.06,1179.22 830,1178.93 1394.76,1178.93 1418.93,1154.76 1418.93,741.07 1266,741.07 1263.06,740.78 1260.23,739.93 1257.63,738.53 1255.34,736.66 1253.47,734.37 1252.07,731.77 1251.22,728.94 1250.93,726 1250.93,-87.08 -87.08,-87.08 -87.08,1365.93 485.93,1365.93
VCC_DDRC on Power Plane (split plane): 573.41,125 573.7,122.06 574.56,119.23 575.95,116.63 577.83,114.34 580.11,112.47 582.72,111.07 585.54,110.22 588.48,109.93 805.77,109.93 808.71,110.22 811.54,111.07 814.15,112.47 816.43,114.34 818.3,116.63 819.7,119.23 820.55,122.06 820.84,125 820.84,1041.93 967.93,1041.93 967.93,74.07 421.07,74.07 421.07,1062.93 573.41,1062.93

## Other copper
Top Layer:
  rectangle net RESET_L: 1454,1622 1478,1635.82
  rectangle net TB2: 1284,1674 1314.82,1727
  rectangle net TB1: 1260,1752 1317.82,1789
  rectangle net NetSB16_1: 1276.18,1806 1316,1843
  rectangle net DDR0_ODT0: 723,38 801,108
  rectangle net NetSB5_2: 1264,1251 1317,1298
  rectangle net GND: 574,536 618,577
  rectangle net VCC3V3_S5: 1654,199 1673,222
  rectangle net NetC182_2: 3602,3033 3642,3120
  rectangle net GND: 2287,926 2326,1105
  rectangle net VDD_CPU_B: 2343,953 2438,1338
  rectangle net GND: 1595,532 1625,565
  rectangle net GND: 885,3294 973,3492
  rectangle net GND: 581,3304 664,3492
  rectangle net NetSB20_1: 1272,1955 1315,1992
  rectangle net NetR75_1: 1303,2048 1337,2084
  rectangle net NetR75_1: 1303,2037 1342,2071
  rectangle net VCC_3V0: 1640.7,467 1661,491.37
  rectangle net VCC_5V: 616,3102.82 647.82,3127
  rectangle net DSP_I2S.I2S2_SD: 2158,2124 2246,2163
  rectangle net NetSB21_1: 2315.95,2062 2408,2114
  rectangle net NetSB11_2: 2263.17,2062 2300.17,2114
  rectangle net NetSB12_2: 2210.38,2062 2247.38,2114
  rectangle net NetSB13_2: 2157.6,2062 2194.6,2114
  rectangle net NetR61_2: 2104.53,2062 2141.53,2114
  rectangle net NetR60_2: 2049.47,2062 2086.47,2114
  rectangle net NetSB14_1: 1942,2062 1979,2108
  rectangle net GND: 1488,156 1519,252
  rectangle net VCC_5V: 1890,331.41 1913,345.19
  rectangle net VCC3V3_SYS: 561,3008 608,3032
  rectangle net VCC3V3_SYS: 561,3009 596,3054
  rectangle net 5V#: 2102,3014 2234,3062
  rectangle net NetL6_2: 1751,199 1768,223
  rectangle net GND: 408.82,3270.82 513.82,3370.82
  rectangle net GND: 168.82,3270.82 297.82,3370.82
  rectangle net GND: 168.82,3363.82 513.82,3468.82
  rectangle net VCC3V3_SYS: 3136.82,1855.82 3186.82,1908.82
  region net PH1_OUT: 2876.82,2839.82 2876.82,2780.82 3001.82,2780.82 3001.82,2839.82
  rectangle net PH0_IN: 3062.82,2869.82 3151.82,2977.82
  rectangle net VCC3V3_SYS: 1874.82,466.82 1898.82,499.82
  rectangle net VCC_RTC: 2054.82,94.82 2086.82,194.82
  rectangle net GND: 3338.82,182.82 3376.82,222.82
  rectangle net GND: 2741.82,182.82 2780.82,222.82
  rectangle net EN_SYR837: 3285.82,169.82 3317.82,250.82
  rectangle net VCC3V3_SYS: 3559.82,540.82 3591.82,721.82
  rectangle net VCC3V3_SYS: 4129.82,179.82 4202.82,480.82
  rectangle net NetC24_2: 4211.82,398.82 4259.82,495.82
  rectangle net NetC27_2: 4211.82,506.82 4259.82,603.82
  rectangle net VCC_DDR: 2081.82,303.82 2165.82,355.82
  rectangle net VFB3: 2195.82,198.82 2229.82,348.82
  rectangle net VFB3#: 1971,211.82 2166.82,293.82
  rectangle net GND: 2431.82,471.82 2464.82,590.82
  rectangle net VCC3V3_SYS: 2783.82,463.82 2820.82,546.82
  rectangle net EN_SY8088#: 2661.82,465.82 2755.82,497.82
  rectangle net FB_SY8088#: 2486.82,386.82 2614.82,519.82
  rectangle net VCC3V3_SYS: 2487.82,528.82 2615.82,590.82
  rectangle net NetL5_2: 2662.82,542.82 2716.82,759.82
  rectangle net GND: 3146.82,570.82 3185.82,643.82
  rectangle net VCC3V3_S5: 3088.82,581.82 3136.82,649.82
  rectangle net VCC_5V: 2932.82,557.82 2975.82,655.82
  rectangle net VCC_5V: 2934.82,582.82 3030.82,655.82
  rectangle net EN_RT9193: 2932.82,499.82 3033.82,535.82
  rectangle net BP_RT9193: 3086.82,508.82 3186.82,549.82
  region net VCC_5V: 2788.82,271.33 2788.82,183.82 2833.82,183.82 2833.82,271.33
  rectangle net NetL2_2: 2788.82,278.82 3009.82,302.82
  region net VCC_5V: 3385.82,271.33 3385.82,183.82 3430.82,183.82 3430.82,271.33
  rectangle net NetL1_2: 3385.82,278.82 3606.82,302.82
  rectangle net EN_SY8088: 2173.82,59.82 2306.82,113.82
  rectangle net VCC_5V: 2362.82,-81.18 2408.82,10.82
  rectangle net FB_SY8088: 2360.82,44.82 2468.82,102.82
  rectangle net VDD_LOG: 2479.82,-13.18 2596.82,79.82
  rectangle net VDD_LOG: 2427.82,-13.18 2596.82,21.82
  rectangle net VCC3V3_SYS: 2701.82,64.82 2830.82,138.82
  rectangle net BYP_SPX3819: 2867.82,-77.18 2932.82,22.82
  rectangle net VCC_5V: 3251.82,-37.18 3300.82,28.82
  rectangle net VFB_TPS563201: 3354.82,-77.18 3452.82,27.82
  rectangle net OSC32KOUT: 1979.44,479.82 2021.44,603.82
  region net NetL6_2: 1770.23,-11.81 1770.23,223.19 1762,223.19 1762,-11.81
  region net GND: 1724.17,241.84 1724.17,199.47 1743.17,199.47 1743.17,241.84
  region net GND: 1680.2,416.44 1622.15,416.44 1622.15,397.44 1680.2,397.44
  region net VCC_5V: 1797.79,141.82 1797.79,223.19 1778.79,223.19 1778.79,141.82
  rectangle net VDD_CPU_L: 1373.82,273.82 1415.82,449.82
  rectangle net VCC_5V: 1587.82,370.39 1645.87,389.39
  rectangle net NetL7_2: 1507.87,342.83 1645.87,361.83
  rectangle net OSC32KIN: 2077.87,478.82 2119.87,603.82
  region net GND: 1856.87,332.83 1622,332.83 1622,316.63 1856.87,316.63
  region net NRST_: 4214.82,3058.82 4214.82,3259.82 4176.82,3259.82 4176.82,3058.82
  region net VCC_1V8: 3333.82,2682.82 3291.82,2682.82 3291.82,2592.82 3333.82,2592.82
  region net VCC_1V8: 3265.82,3024.82 3225.82,3024.82 3225.82,2970.82 3265.82,2970.82
Bottom Layer:
  rectangle net VDD_CENTER: 1858,1510 1967.82,1553.14
  rectangle net VCC_3V0: 1441,1315 1533,1355
  rectangle net GND: 579,399.98 601,468.46
  rectangle net VCC_DDRC: 542,403.4 573,468.46
  rectangle net GND: 535,89 577,113
  rectangle net VCC_DDRC: 488,354 513,381
  rectangle net GND: 518,292.24 547.95,379.91
  rectangle net GND: 433.51,493.51 479.62,550.98
  rectangle net VCC_DDRC: 485.89,493.51 532,550.98
  rectangle net VCC1V8_DDR: 546,928 581.73,956.14
  rectangle net VCC_DDRC: 819,974 842,1006
  rectangle net GND: 801.02,874 836,924
  rectangle net VCC_DDRC: 438,292.24 513,362.07
  rectangle net DDR0_ODT0: 569,167 597,202
  rectangle net VCC_DDR: 541,814 562,913
  rectangle net GND: 661,934 738,955
  rectangle net VCC_DDR: 661,970 738,991
  region net GND: 762,413.73 722,413.73 722,385.73 762,385.73
  rectangle net VCC1V8_DDR: 778,385.73 811,413.73
  rectangle net VCC_DDRC: 870,333 897,365
  rectangle net VCCA_0V9: 1548,1503 1570,1532
  rectangle net DDR1_ODT0: 792,709 817,743
  rectangle net VCC_DDRC: 907,417 946,449
  rectangle net GND: 1864,1719 1884,1740
  rectangle net GND: 551,89 577,151
  rectangle net DDR1_PZQ: 1782,1389 1824,1442
  rectangle net GND: 1782,1362 1822,1382
  rectangle net GND: 1782,1346.32 1904,1369
  rectangle net VCCA_0V9: 1832,1382 1901.89,1402
  rectangle net GND: 2103,1080.68 2172,1158.84
  rectangle net GND: 1794,1143 2170,1164
  rectangle net GND: 1794,1092 1882,1155.32
  rectangle net GND: 1794,1080.68 2170,1101.68
  rectangle net VCC1V8_DDR: 796,649.25 820.57,683.42
  rectangle net VCC1V8_DDR: 583,788 606,814
  rectangle net VCC_DDR: 1767,1028 2144,1065
  region net VCC_DDR: 761,1066 722,1066 722,1035 761,1035
  rectangle net GND: 779,1035 808,1066
  rectangle net VCC_DDR: 1767,1185 2220,1209.92
  rectangle net NetR51_1: 2023,1618 2069,1658
  rectangle net I2C0_SDA_PMIC: 1502,605 1549,634
  rectangle net I2C0_SDA_PMIC: 1492.82,483.82 1528.82,634
  rectangle net VCC_DDR: 979,933 1035,956
  region net VCC3V3_S5: 1587.18,127.88 1626.17,128.18 1625.82,174 1586.83,173.7
  rectangle net GND: 372,740 430,770
  rectangle net VCC_DDRC: 847,876.47 899,904
  rectangle net VCC_DDRC: 867,802 892,898
  rectangle net NetD29_1: 3710,1063 3916,1187
  rectangle net VCC3V3_SYS: 3941,1274 3980,1340
  rectangle net VCC5V0_HOST1: 1443,3123 1499,3148
  rectangle net GND: 1443,3154 1766,3187
  rectangle net NetD15_2: 1387,3245 1487,3299
  rectangle net VCC_5V: 1541,3115 1635,3149
  rectangle net NetD15_1: 1526,3195 1595,3352
  rectangle net GND: 3431,2794 3564,2845
  rectangle net GND: 1695,541 1782,572
  rectangle net GND: 1596,455 1618,564
  rectangle net GND: 1578,622 1728,645
  rectangle net VCC3V3_SYS: 1578,585 1683,608
  rectangle net GND: 1722,1789 1768,1845
  rectangle net GND: 1670,1955 1715.41,1972
  rectangle net GND: 1681,1926.09 1715.41,1972
  rectangle net GND: 1906,1946 1955,1984
  rectangle net XOUT: 1467,1828 1518,1925
  rectangle net GND: 1651,1485 1691,1551
  rectangle net GPIO2_B0/I2C7_SCL: 1483,1377 1536,1412.74
  rectangle net GND: 1927,1560.94 2008,1625
  rectangle net VCC3V3_S5: 1608,128 1650,253
  rectangle net GND: 1656,128 1714,168
  rectangle net VCC3V3_SYS: 1829,483 1907,514
  rectangle net VCC3V3_S3: 1789,483 1824,513
  region net NetC50_2: 1744,533 1699.82,533 1699.82,465.82 1744,465.82
  rectangle net GND: 1490,1719 1517,1817
  rectangle net VCC_DDR: 2184,1169 2220,1203
  rectangle net VCC_DDR: 2066,1178.82 2220,1208.92
  rectangle net GND: 1854,1330 1880,1365.5
  rectangle net GND: 2631,505 2698,534
  rectangle net XOUT: 1338.14,1938 1386,1981
  rectangle net XOUT#: 1372,1828 1394.14,1850
  rectangle net VDD_CPU_L: 1017,1398.82 1297.82,1477
  rectangle net GND: 2295,1470.26 2331,1615
  region net PORT_CEC: 2083.94,3254 2062,3254 2062,3192.71 2083.94,3192.71
  rectangle net HDMI_OUT.PORT_HPD: 2153,3193 2190,3253
  rectangle net VCC_5V: 40.16,2873.21 153,2972
  rectangle net NetD21_1: 44,2738 144.05,2844
  rectangle net GND: 1695,541 1728,632
  rectangle net GND: 1656,128 1681.32,279
  rectangle net I2C3_HDMI.I2C3_SCL_HDMI: 1813,2910 1853,2998
  rectangle net HDMI_CEC: 2008,2887 2052,2998
  rectangle net VCC_3V0: 2082,2910 2122,2998
  rectangle net VCC_3V0: 1883,2910 1923,2998
  rectangle net I2C3_HDMI.I2C3_SDA_HDMI: 2309,2910 2349,2998
  rectangle net VCC_3V0: 2379,2910 2419,2998
  rectangle net GND: 1882.82,199.82 1967.82,248.82
  rectangle net GND: 4165.82,2612.82 4271,2662.82
  rectangle net GND: 3065.82,1083.82 3256.82,1213.82
  rectangle net VCC_1V8: 3485.82,2740.82 3568.82,2784.82
  rectangle net VCC_1V8: 3141.82,1973.3 3186.61,2058.82
  rectangle net GND: 4232.82,3122.82 4271,3252.82
  rectangle net GND: 3696.82,3131.82 3821.82,3204.82
  rectangle net VCC3V3_SYS: 3129.82,1816.82 3186.82,1965.82
  rectangle net GND: 3197.82,1854.82 3285.82,2057.82
  rectangle net VCC3V3_S3: 1917.82,464.82 1982.82,565
  rectangle net VCCA_0V9: 2422.82,381.82 2539.82,416.82
  rectangle net GND: 4121.82,1004.82 4273.82,1071.82
  rectangle net GND: 4089.82,1143.82 4119.82,1257.82
  rectangle net UART2DBG.UART2DBG_TX: 3991.82,1004.82 4098.82,1128.82
  rectangle net UART2DBG.UART2DBG_RX: 4000.82,1276.82 4074.82,1319.82
  rectangle net UART2_TXD: 4126.82,1080.82 4273.82,1191.82
  rectangle net UART2_RXD: 4125.82,1210.82 4273.82,1321.82
  rectangle net VCC3V0_SD: 3052.82,289.82 3150.82,326.82
  rectangle net BYP_SPX3819_SD: 3106.82,163.82 3176.82,253.82
  rectangle net VCC3V3_SYS: 3208.82,298.82 3305.82,328.82
  rectangle net VCC3V3_SYS: 3265.82,283.82 3305.82,328.82
  rectangle net SDMMC0_PWR: 3208.82,222.82 3305.82,255.82
  rectangle net NetLED4_2: 3196.82,578.82 3251,623.82
  rectangle net NetQ9_3: 3473.82,534.82 3524.82,624.82
  rectangle net NetLED3_2: 3400.82,581.82 3464.82,619.82
  rectangle net NetQ6_1: 3505.82,643.82 3614.82,679.82
  rectangle net NetQ9_1: 3512.82,437.82 3616.82,489.82
  rectangle net NetD30_2: 3934.82,653.82 3976.82,703.82
  rectangle net GND: 4208.82,466.82 4263.82,562.82
  rectangle net NetQ2_1: 4149.82,466.82 4195.82,620.82
  rectangle net NetC27_2: 4217.82,581.82 4258.82,645.82
  rectangle net NetQ7_1: 3878.82,826.82 3970.82,865.82
  rectangle net NetQ7_1: 3878.82,773.82 3916.82,862.82
  rectangle net GND: 2438.82,464.82 2479.82,633.82
  region net VCCA_0V9: 2539.82,548.82 2493.82,548.82 2493.82,381.82 2539.82,381.82
  rectangle net FB_SY8088#: 2563.82,387.82 2599.82,446.82
  rectangle net GND: 2265.7,45.82 2358.7,80.82
  rectangle net LOG_DVS_PWM: 2156.82,45.82 2249.82,80.82
  rectangle net NetC2_1: 2213.82,-12.18 2411.82,19.82
  rectangle net FB_SY8088: 2374.82,45.82 2522.82,105.82
  rectangle net VCC_5V: 1827.82,253.82 1964,295
  rectangle net NetC34_2: 1762.82,258.82 1820.82,369.82
  region net NetC34_2: 1820.82,309.82 1688,309.82 1688,258.82 1820.82,258.82
  rectangle net VCC_VDC: 1641.82,332.82 1731.82,369.82
  rectangle net GND: 2781.82,-78.18 2976.82,-22.18
  rectangle net GND: 2894.82,-78.18 2976.82,37.82
  rectangle net EN_SPX3819: 2759.82,-14.18 2878.82,24.82
  rectangle net VCC_EFUSE: 2894.82,46.82 2976.82,91.82
  rectangle net VCC3V3_SYS: 3479.82,-77.18 3511.82,10.82
  region net GND: 3341,120.82 3266.82,120.82 3266.82,73.82 3341,73.82
  rectangle net VBST: 3358.82,73.82 3424.82,120.82
  region net GND: 1905.82,543.82 1757,543.82 1757,521 1905.82,521
  rectangle net GND: 2311.82,1470.82 2363.82,1796.82
  rectangle net I2C0_SCL_PMIC: 1436.82,483.82 1472.82,550.82
  rectangle net GND: 1801.82,382.82 1982.82,457.82
  rectangle net VCC_1V8: 579.82,1501.82 662.82,1518.82
  rectangle net GND: 1469.82,1672.67 1501,1817
  rectangle net XIN: 1390.82,1677 1451.82,1797
  rectangle net GND: 1403.82,1828.82 1456.82,1948.82
  rectangle net XIN: 1338.14,1778.82 1412.82,1814.82
  rectangle net XOUT#: 1338.14,1842.82 1394.14,1922.82
  rectangle net VCC_5V: 1628.82,408.82 1655,562.82
  rectangle net VCC_5V: 1628.82,379.82 1790.82,453.82
  region net NetP36_2: 2934.82,3371.82 2934.82,3486.82 2855.82,3486.82 2855.82,3371.82
  region net NetP37_2: 2714.82,3371.82 2714.82,3486.82 2635.82,3486.82 2635.82,3371.82
  rectangle net VCC_1V8: 1600.82,1429.82 1615,1471.19
  rectangle net NetC230_2: 769.82,1520.82 827.82,1570.82
  rectangle net GND: 591.82,1537.82 662.82,1563.82
  rectangle net VCC_1V8: 618,1484 666.82,1519.82
  rectangle net GND: 524.82,1439.82 550.82,1529.82
  rectangle net VCC_1V8: 561.82,1439.82 583.82,1530.82
  region net BOOT0_: 3371.82,3034.82 3341.67,3034.82 3341.67,2983.82 3371.82,2983.82
  region net VCC_1V8: 3319.82,3025.82 3227.82,3025.82 3227.82,2945.82 3319.82,2945.82
  region net VCAP_1: 3477.82,2779.82 3433.82,2779.82 3433.82,2683.82 3477.82,2683.82
Power Plane (plane layer: these items are gaps in the copper):
  lines w10: 2111.82,2092.82 2117,2087.64 ; 2360,733 2363,730 ; 2485.82,2092.82 2488,2095 2490.18,2092.82 ; 3047,1548 3047,1613
  lines w30: -109,1381 882,1381 882,1590 ; 449,2880 1486,2880 1486,3177 1358.06,3177 1358,3177 1358,3048 ; 449,3046 449,2838 ; 449,3047 1359,3047 ; 451,2877.79 451,3047 852.94,3047 852.94,3365 156,3365 156,2838 ; 509,1378 501,1378 501,1238 786,1238 ; 786,1381 786,1238 ; 1113,1639 1269.82,1639 1269.82,1704.18 1269.82,1787 1567.06,1787 1685.44,1787 1685.44,1639 1794,1639 ; 1434,692 1434,1161 1401,1194 830,1194 786,1238 ; 1486,3024 1486,3077 2488,3077 ; 1620,412 1620,632 ; 1620,726 1620,632 ; 1620,726.82 2089,726.82 2089,725.82 2190.82,725.82 3045,725.82 3045,1751 3042,1754 2854,1754 ; 1723.8,1397.8 1723.8,1548 1765,1548 ; 1765,1549 1766,1548 3047,1548 ; 1794,1554 1794,1754 2854,1754 ; 1859,1750 1800.59,1750 1800.59,1894 1112,1894 1112,1749 1112,1393.2 2363,1393.2 2363,1246 2363,727 ; 2488,2095 2488,3077 ; 2490.18,2092.82 2854,2092.82 2854,1754 ; 3697,-99 3688,-108 1266,-108 1266,726 1434,726 1434,410 1641,410 1819,232 1819,-16 2294,-16 2375,65 2375,422 2425,472 2947,472 2947,15.82 3274,15.82 3274,603 2392,603 2290,501 2290,117 2230,57 1890,57 1890,378 1945,433 1945,632 1620,632 ; 4303,3077 2488,3077 ; 156,2838 156,1590 882,1590 ; 156,2838 449,2838 ; 449,2838 449,1974 749,1974 882,1841 882,1590 ; 406,59 406,1078 588.48,1078 588.48,125 805.77,125 805.77,1057 983,1057 983,59 406,59